# Altium PCB BNC Adapter (Nutzen).PcbDoc
Units mm, origin at the board's own origin, x right, y up, seen from the top; angles counter-clockwise.
Board outline 152 x 97.5 mm, 2 copper layers (Top Layer, Bottom Layer), stack 1 mm thick; 3 components, 8 nets, 2 pads, 0 vias.
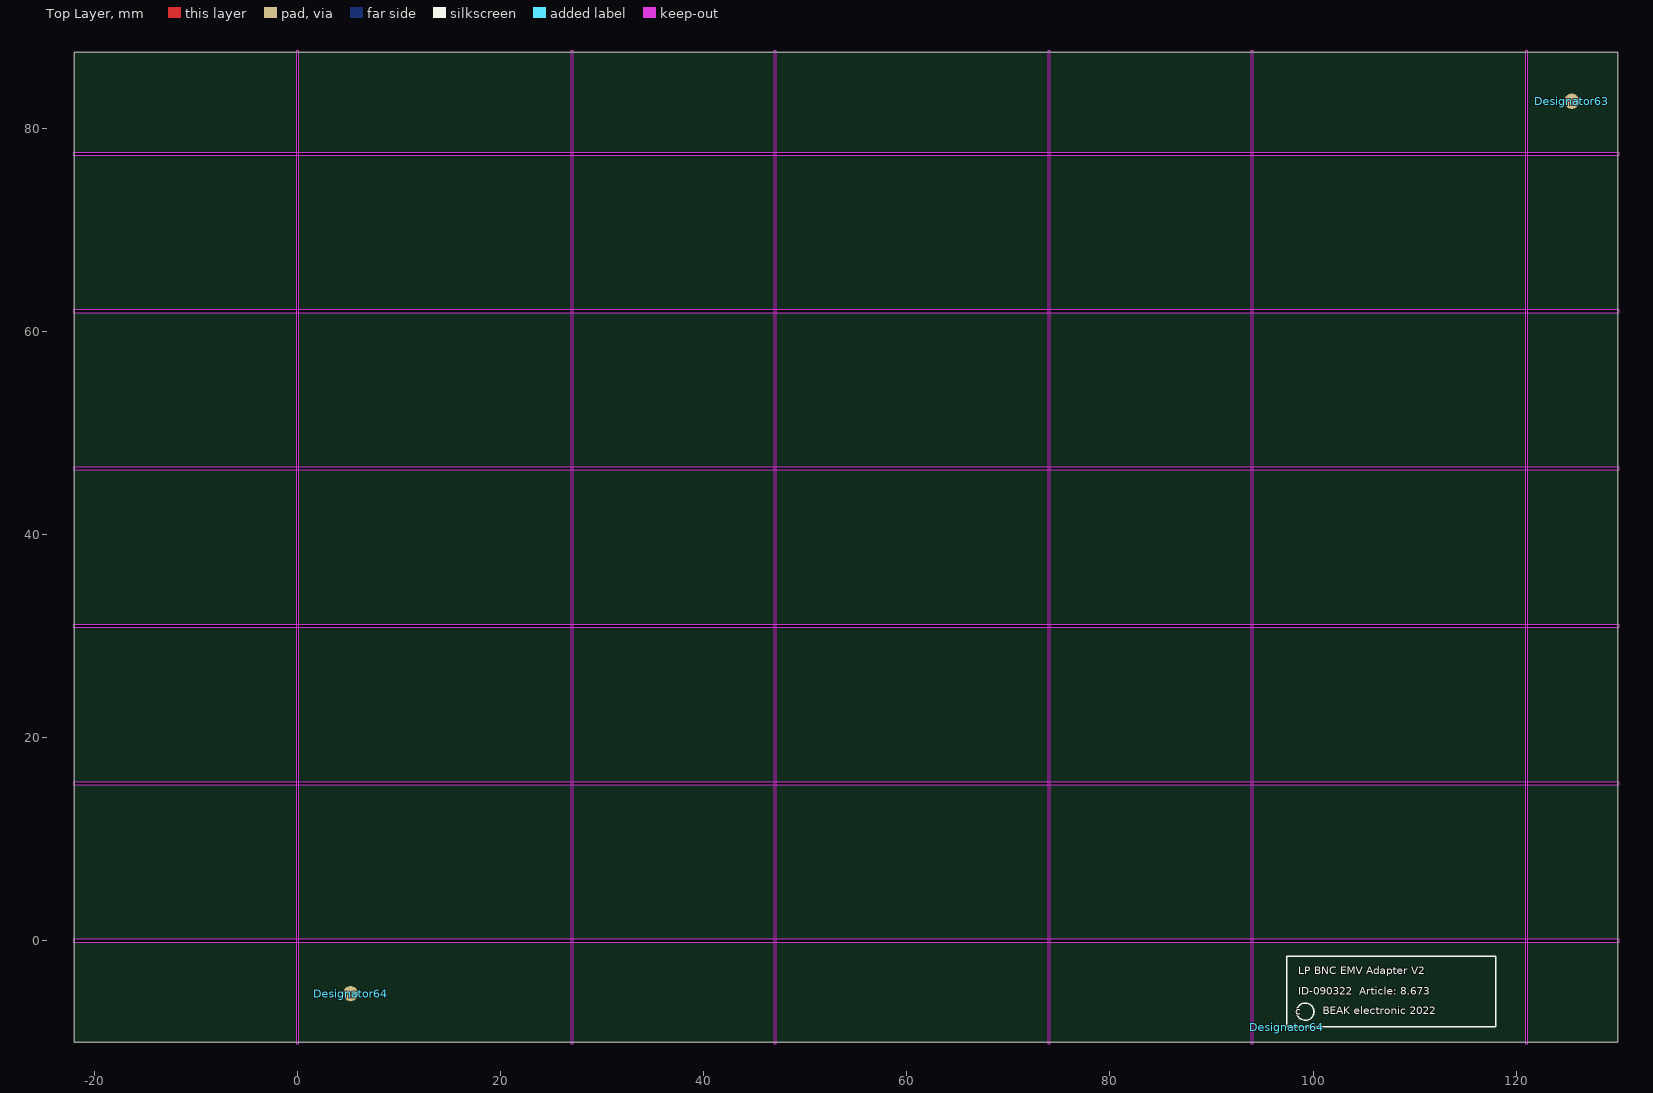
[diagram p0: Top Layer view]
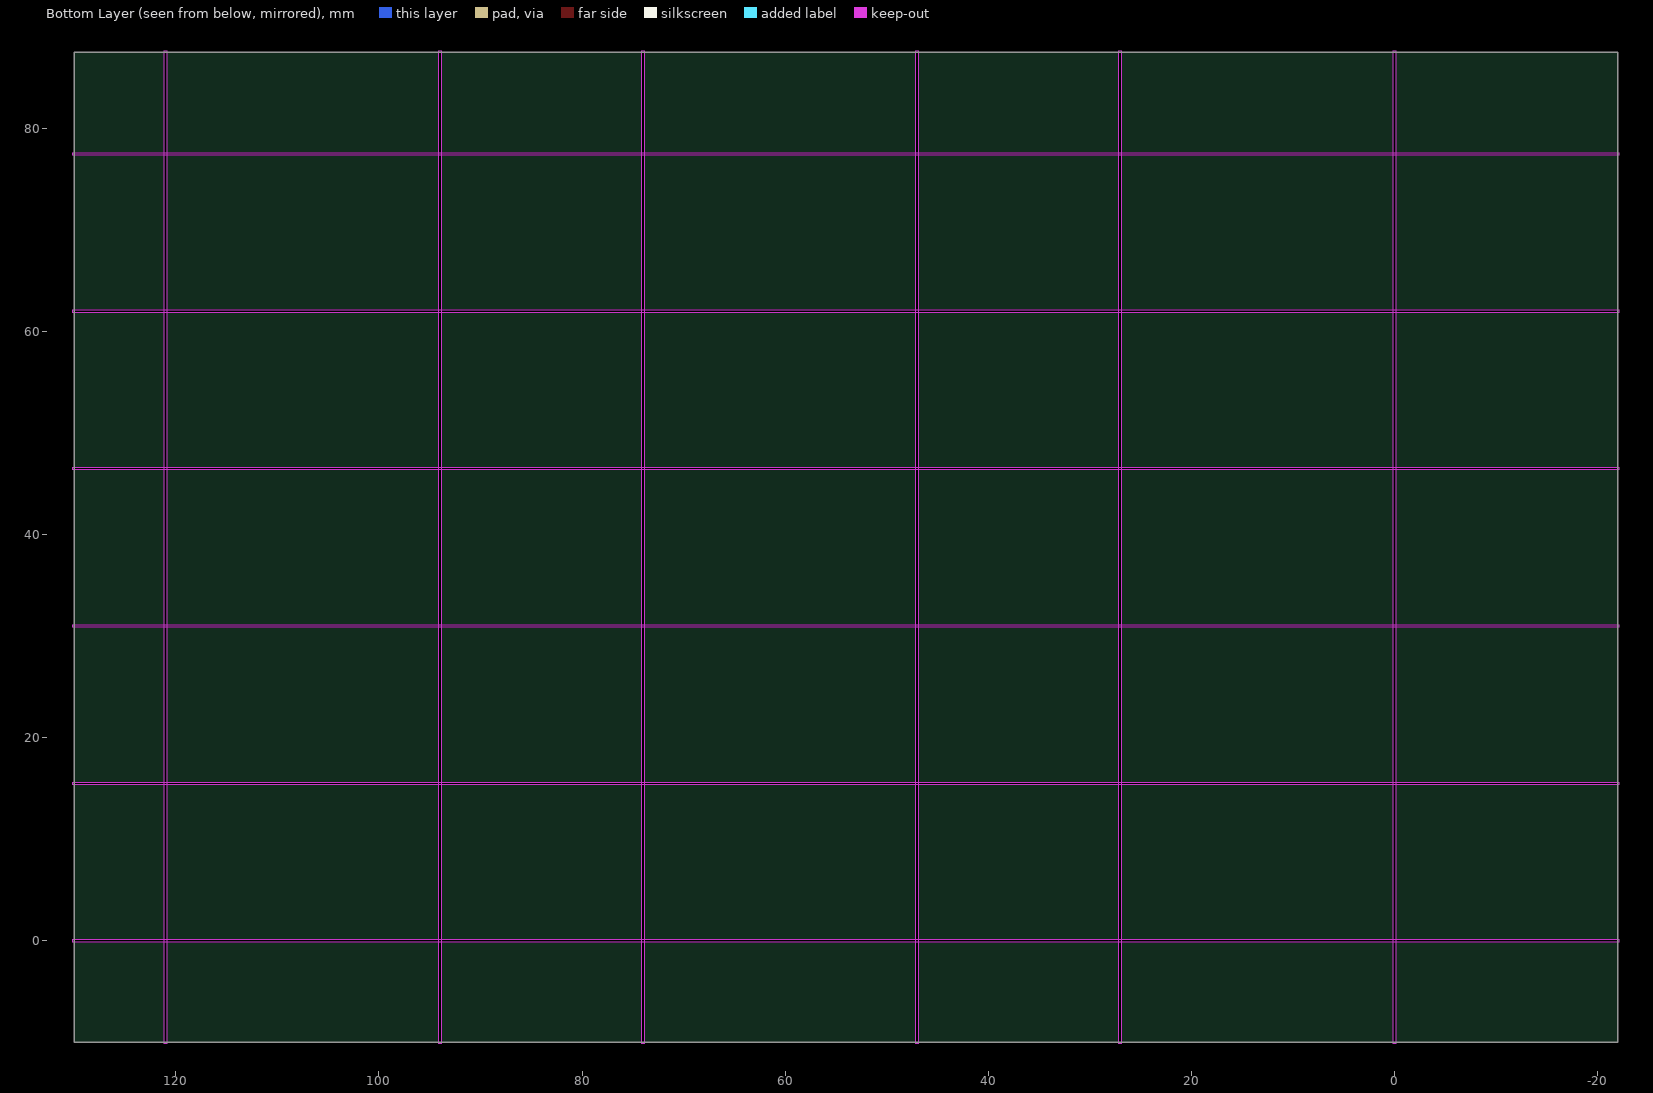
[diagram p1: Bottom Layer view, seen from below]

## Layer stack, top to bottom
Top Solder: solder mask 0.0102, Solder Resist, Dk 3.5
Top Layer: signal copper 0.2
Dielectric1: core 0.6, FR-4, Dk 4.8
Bottom Layer: signal copper 0.2
Bottom Solder: solder mask 0.0102, Solder Resist, Dk 3.5

## Board outline
-22,87.5 130,87.5 130,-10 -22,-10
cut-out: 120.873,-10.16 121.127,-10.16 121.127,87.63 120.873,87.63
cut-out: 73.873,-10.16 74.127,-10.16 74.127,87.63 73.873,87.63
cut-out: 26.873,-10.16 27.127,-10.16 27.127,87.63 26.873,87.63
cut-out: -0.127,-10.16 0.127,-10.16 0.127,87.63 -0.127,87.63
cut-out: -22.098,77.627 -22.098,77.373 130.175,77.373 130.175,77.627
cut-out: -22.098,62.127 -22.098,61.873 130.175,61.873 130.175,62.127
cut-out: -22.098,46.627 -22.098,46.373 130.175,46.373 130.175,46.627
cut-out: -22.098,31.127 -22.098,30.873 130.175,30.873 130.175,31.127
cut-out: -22.098,15.627 -22.098,15.373 130.175,15.373 130.175,15.627
cut-out: -22.098,0.127 -22.098,-0.127 130.175,-0.127 130.175,0.127
cut-out: 46.873,-10.16 47.127,-10.16 47.127,87.63 46.873,87.63
cut-out: 93.873,-10.16 94.127,-10.16 94.127,87.63 93.873,87.63

## Design rules (kind name [scope] priority, off if disabled: settings)
Clearance "Clearance Polygon" [(InPolygon) vs (IsComponent OR IsFill OR IsPad OR IsTrack OR IsVia or isarc)] p1: gap=0.254 ignorepadtopadclearanceinfootprint=FALSE except(0: Arc-Hole Track-Hole SMDPad-Hole THPad-Hole Via-Hole Fill-Hole Poly-Hole Region-Hole Text-Hole) // BEAK
Clearance [All] p2: gap=0.2 ignorepadtopadclearanceinfootprint=FALSE except(0: Arc-Hole Track-Hole SMDPad-Hole THPad-Hole Via-Hole Fill-Hole Poly-Hole Region-Hole Text-Hole)
FabricationTestPointUsage TestPointUsage [All] p1: valid=0 allowmultiple=FALSE
FabricationTestpoint Testpoint [All] p1: side=3 testpointundercomponent=TRUE minsize=1.016 maxsize=2.54 preferedsize=1.524 minholesize=0 maxholesize=1.016 preferedholesize=0.813 testpointgrid=0.025 allowsidetop=TRUE allowsidebottom=TRUE usegrid=TRUE gridtolerance=0
Height [All] p1: minheight=0 maxheight=254 prefheight=12.7
HoleSize [All] p1: absolutevalues=TRUE maxlimit=25.4 minlimit=0.025 maxpercent=80.000 minpercent=20.000
MinimumSolderMaskSliver [All] p1: minsoldermaskwidth=0.051
PlaneConnect [All] p1: planeconnectstyle=Direct reliefexpansion=0.508 reliefentries=4 reliefconductorwidth=0.254 reliefairgap=0.254
PolygonConnect [All] p1: connectstyle=Direct reliefconductorwidth=0.254 reliefentries=4 polygonreliefangle="90 Angle" airgapwidth=0.254
RoutingVias [All] p1: holewidth=0.5 width=1 viastyle="Through Hole" minholewidth=0.4 minwidth=0.4 maxholewidth=0.6 maxwidth=2
SilkToSilkClearance [All] p1 off: silktosilkclearance=0.254
SilkToSolderMaskClearance SilkscreenOverComponentPads [IsPad] p1 off: minsilkscreentomaskgap=0.254 clearancetoexposedcopper=TRUE
SolderMaskExpansion [All] p1: expansion=0.102 istentingtop=FALSE
Width [All] p1: maxlimit=5.08 minlimit=0.254 preferedwidth=0.254
22 further rules are at their usual default settings.

## Components (designator, comment, footprint, x,y, rotation, side; value= is the part's Value field where it differs from the comment)
Designator63 "Comment" "M REF 3" 125.476,82.677 r0 top
Designator64 "Comment" "BEAK LP-Aufdruck III" 97.409,-8.509 r0 top
Designator64 "Comment" "M REF 3" 5.207,-5.207 r0 top

## Footprints (in the part's own frame and the unit in brackets; to place one, negate y for a bottom-side part, rotate by r counter-clockwise, add the part's x,y. Pads: shape width x height; smd on the part's side, far side on the other; paste and mask are expansions set on the pad)
"BEAK LP-Aufdruck III" [mm]
  silkscreen extent 0,0.03 20.57,6.98
"M REF 3" [mm] "Referenzmarke Rund"
  round 1.5 smd mask+0.05: 0(0,0)

## Nets (pads, with @x,y where several pads share a name; then routed paths per layer and width w, separated by ;. In a path a pad name is that pad's centre, name@x,y a point inside that pad or via, vN(x,y) a via of type N, cw(c..) or ccw(c..) an arc to the next point about the centre after c; other vN are vias at no path point)
NetBNC1_1: 
NetBNC1_2: 
NetBNC1_3: 
NetC3_2: 
NetFB1_1: 
NetFB2_2: 
NetFB3_1: 
NetFB5_1: 
pads on no net: Designator63.0 Designator64.0

## Silkscreen, mask and mechanical layers (free items; w line width, h text height)
Mechanical 1:
  lines w0.254: -28.48,0 -22.638,0 ; -28.48,15.494 -22.638,15.494 ; -28.48,30.988 -22.638,30.988 ; -28.48,46.482 -22.638,46.482 ; -28.48,61.976 -22.638,61.976 ; -28.48,77.5 -22.638,77.5 ; -25.432,-0.889 -22.638,0 ; -25.432,0.889 -22.638,0 ; -25.432,14.605 -22.638,15.494 ; -25.432,16.383 -22.638,15.494 ; -25.432,30.099 -22.638,30.988 ; -25.432,31.877 -22.638,30.988 ; -25.432,45.593 -22.638,46.482 ; -25.432,47.371 -22.638,46.482 ; -25.432,61.087 -22.638,61.976 ; -25.432,62.865 -22.638,61.976 ; -25.432,76.611 -22.638,77.5 ; -25.432,78.389 -22.638,77.5 ; -22,15.5 0,15.5 ; -22,31 0,31 ; -22,46.5 0,46.5 ; -22,62 0,62 ; -0.889,90.932 0,88.138 ; 0,93.98 0,88.138 ; 0.889,90.932 0,88.138 ; 26.111,90.932 27,88.138 ; 27,-10 27,0 ; 27,77.5 27,87.5 ; 27,93.98 27,88.138 ; 27.889,90.932 27,88.138 ; 46.111,90.932 47,88.138 ; 47,93.98 47,88.138 ; 47.889,90.932 47,88.138 ; 73.111,90.932 74,88.138 ; 74,-10 74,0 ; 74,77.5 74,87.5 ; 74,93.98 74,88.138 ; 74.889,90.932 74,88.138 ; 93.111,90.932 94,88.138 ; 94,93.98 94,88.138 ; 94.889,90.932 94,88.138 ; 120.111,90.932 121,88.138 ; 121,-10 121,0 ; 121,77.5 121,87.5 ; 121,93.98 121,88.138 ; 121.889,90.932 121,88.138 ; -22,0 -22,-10 0,-10 ; -22,0 -22,77.5 ; -22,0 0,0 ; -22,77.5 -22,87.5 0,87.5 ; -22,77.5 0,77.5 ; 0,-10 47,-10 ; 0,-10 0,0 ; 0,0 47,0 ; 0,0 0,15.5 ; 0,15.5 0,31 ; 0,15.5 47,15.5 ; 0,31 0,46.5 ; 0,31 47,31 ; 0,46.5 0,62 ; 0,46.5 47,46.5 ; 0,62 0,77.5 ; 0,62 47,62 ; 0,77.5 0,87.5 ; 0,77.5 47,77.5 ; 0,87.5 47,87.5 ; 47,-10 94,-10 ; 47,-10 47,0 ; 47,0 47,15.5 ; 47,0 94,0 ; 47,15.5 47,31 ; 47,15.5 94,15.5 ; 47,31 47,46.5 ; 47,31 94,31 ; 47,46.5 47,62 ; 47,46.5 94,46.5 ; 47,62 47,77.5 ; 47,62 94,62 ; 47,77.5 47,87.5 ; 47,77.5 94,77.5 ; 47,87.5 94,87.5 ; 94,-10 130,-10 130,0 ; 94,-10 94,0 ; 94,0 120,0 130,0 ; 94,0 94,15.5 ; 94,15.5 94,31 ; 94,15.5 130,15.5 ; 94,31 94,46.5 ; 94,31 130,31 ; 94,46.5 94,62 ; 94,46.5 130,46.5 ; 94,62 94,77.5 ; 94,62 130,62 ; 94,77.5 94,87.5 ; 94,77.5 130,77.5 ; 94,87.5 130,87.5 130,77.5 ; 130,0 130,15.5 ; 130,15.5 130,31 ; 130,31 130,46.5 ; 130,46.5 130,62 ; 130,62 130,77.5
  text "PCB-FR4, 1,2mm thickness" at 39.624,106.299 h1.3
  text "1/1 OZ., LF, HAL" at 44.069,103.886 h1.3
  text "BLACK" at 50.546,101.092 h1.3
  text "V-CUT" at -2.54,94.996 h1.3
  text "V-CUT" at 24.46,94.996 h1.3
  text "V-CUT" at 44.46,94.996 h1.3
  text "V-CUT" at 71.46,94.996 h1.3
  text "V-CUT" at 91.46,94.996 h1.3
  text "V-CUT" at 118.46,94.996 h1.3
  text "V-CUT" at -35.179,76.962 h1.3
  text "V-CUT" at -35.179,61.438 h1.3
  text "V-CUT" at -35.179,45.944 h1.3
  text "V-CUT" at -35.179,30.45 h1.3
  text "V-CUT" at -35.179,14.956 h1.3
  text "V-CUT" at -35.179,-0.538 h1.3

## Panel: embedded boards
"BNC Adapter.PcbDoc" at 94,0, 5 rows x 1 columns, spacing 15.5 x 47, rotation 0
"BNC Adapter.PcbDoc" at 47,0, 5 rows x 1 columns, spacing 15.5 x 47, rotation 0
"BNC Adapter.PcbDoc" at 0,0, 5 rows x 1 columns, spacing 15.5 x 47, rotation 0

## Text inside footprints (layer, text, board x,y; h text height)
Designator64: Top Overlay "c" at 98.222,-7.264 h0.76; Top Overlay "BEAK electronic 2022" at 100.965,-7.214 h0.76; Top Overlay "ID-090322  Article: 8.673" at 98.552,-5.309 h0.76; Top Overlay "LP BNC EMV Adapter V2" at 98.552,-3.277 h0.76